# Altium PCB BMS042A_PCB.PcbDoc (part 3 of 5)
Units mil, origin at the board's own origin, x right, y up, seen from the top; angles counter-clockwise.
Board outline 4409.45 x 3307 mil, 6 copper layers (Top Layer, Layer 2 - PGND, Layer 3, Layer 4, Layer 5 - PGND, Bottom Layer), stack 60.8 mil thick; 273 components, 77 nets, 544 pads, 927 vias.
Unrouted connection lines stored in the file: 219.
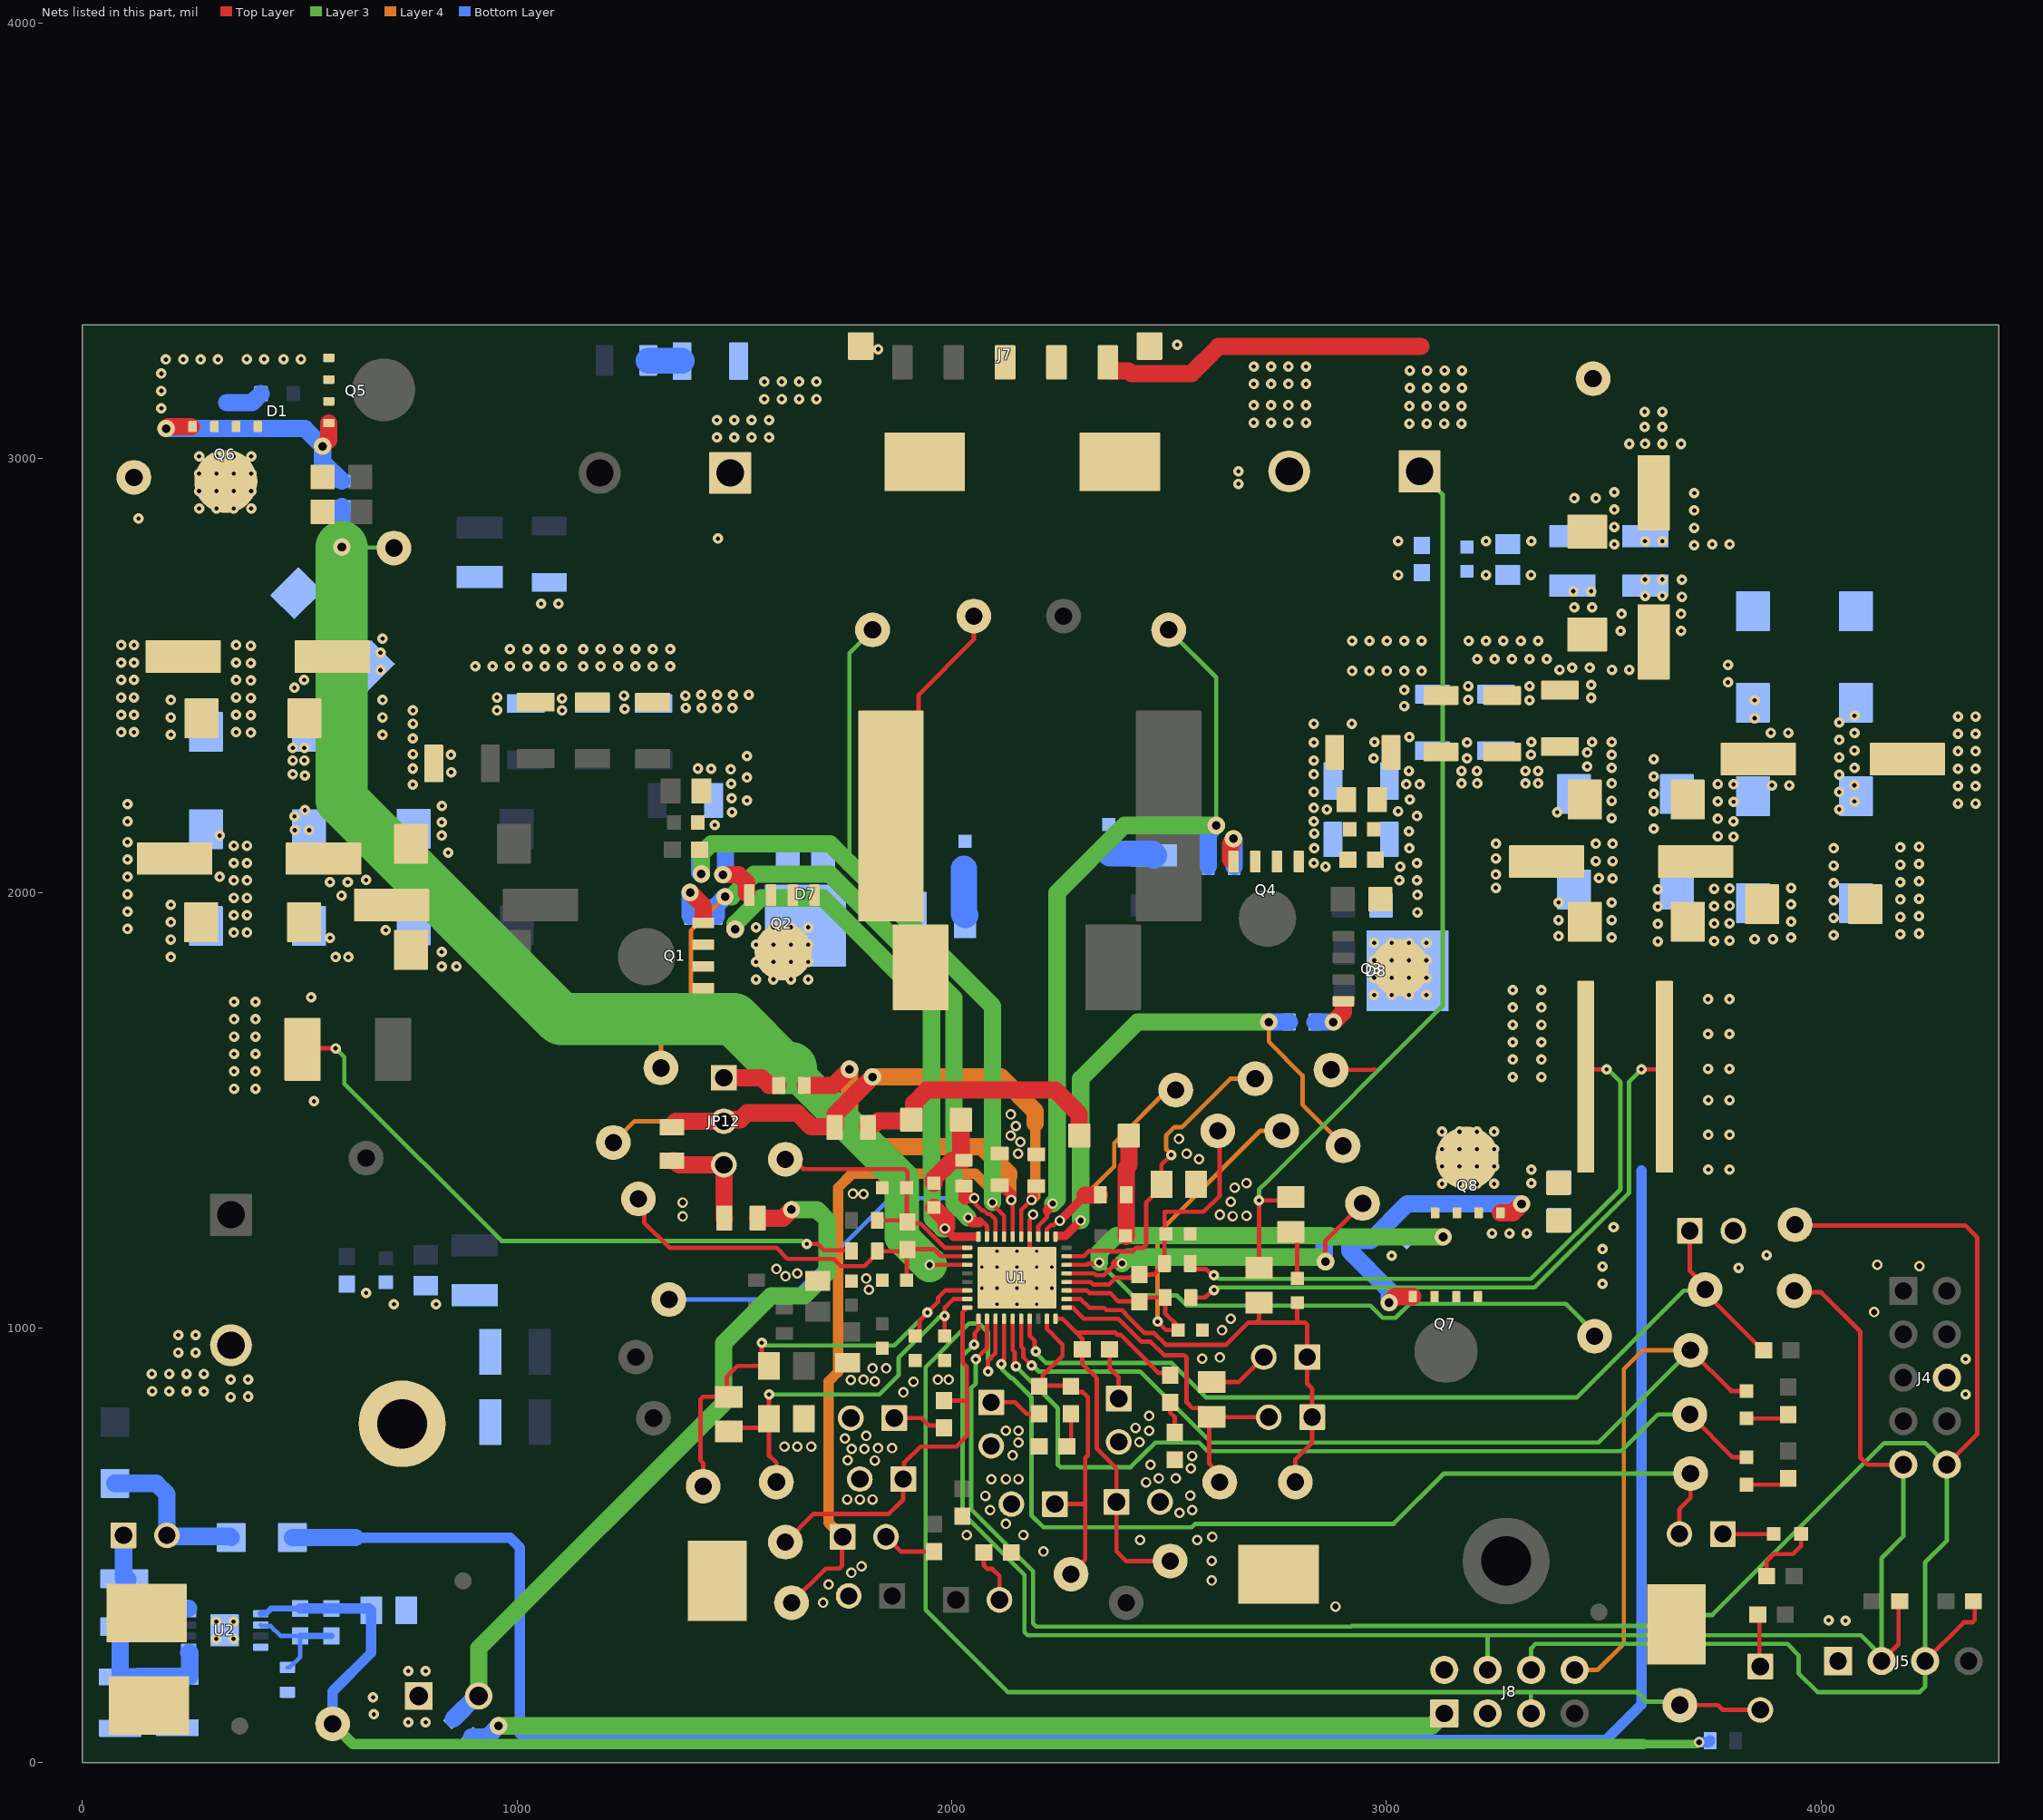
[diagram p6: the nets of this part, all layers, seen from the top]

## Part data (continued)
J7: library part CMP-0097332-1, "Conn Board to Board HDR 5 POS 3mm Solder RA SMD T/R", Current_A=5A, Digikey Part Number=478-109159005101916CT-ND, Manufacturer="KYOCERA AVX", Mouser Part Number=581-109159005101916, Operating Temperature Range="-40°C to +125°C", Voltage_V=125V, AEC Qualified=No, ComponentLink1Description=Datasheet, ComponentLink1URL=https://datasheets.kyocera-avx.com/HorizontalPlug_10-9159.pdf, Conn Gender=Male, Conn Orientation=Horizontal, ContactFinish=Gold,Nickel, datasheet=https://datasheets.kyocera-avx.com/HorizontalPlug_10-9159.pdf, Datasheet Path=datasheets/Conn-109159005101916.pdf, Digikey Description="CONN SSL PLUG", DUT-Pitch_mm=3mm, helpURL=https://upverter.com/upn/revision/17913b53be5bcd53/, Lead Free=Yes, Mouser Description="Conn Board to Board HDR 5 POS 3mm Solder RA SMD T/R", PackageReference=CONN_SSL_PLUG5, Part Number=109159005101916, PartNumber=109159005101916, PinCount=5, RoHS=TRUE, Row_Count=1, SizeZ_mm=3.1mm, Standoff Height=0.1mm, Supplier 1=Digikey, Supplier 2=Mouser, Supplier Part Number 1=478-109159005101916CT-ND, Supplier Part Number 2=581-109159005101916
J8: library part CMP-0075408-3, "Header, 100mil, 4x2, Gold, TH", Color=Black, Current_A=6.3A, Manufacturer=Samtec, Supplier Part Number 1=SAM1028-04-ND, Voltage_V=550V, Cert_CSA=Y, Cert_CULUS=N, Cert_UL=Y, Cert_VDE=N, ClassName=Header, ComponentLink1Description="Datasheet URL", ComponentLink1URL=http://samtec.com/ftppub/pdf/TSW_TH.PDF, CompType=Header, ContactFinish=Gold, Gender=Male, Green_EU RoHS=Passed, Green_EU RoHS-2=Passed, Green_Lifecycle=Active, Green_REACh=Passed, MountType=TH, Orientation=Vertical, PackageReference="4x2 Header", PartNumber=TSW-104-07-G-D, PinCount=8, Pitch_mm=2.54, RoHS=Y, Row_Count=2, RowSpacing_mm=2.54, Shrouded=N, Supplier 1=Digi-Key, Supplier 2=Mouser, Supplier 3=Newark, Supplier Part Number 2=200-TSW10407GD, Supplier Part Number 3=56AC7178
JP1 JP2 JP13 JP14 JP15: library part CMP-0002337-1, "Header, 100mil, 2x1, Tin, TH", Color=Black, Current_A=3A, Manufacturer="Sullins Connector Solutions", Supplier Part Number 1=S1012E-02-ND, Voltage_V=1.8kV, Cert_UL=Y, ClassName=Header, CNHeader=TRUE, ComponentLink1Description="Datasheet URL", ComponentLink1URL=http://www.sullinscorp.com/catalogs/77_PAGE108-109_.100_MALE_HDR.pdf, CompType=Header, ContactFinish=Tin, CT=FALSE, Gender=Male, Green_EU RoHS=Incomplete, Green_EU RoHS-2=Incomplete, Green_Lifecycle="Not Set", Green_REACh=Incomplete, LatestRevisionDate=26/05/2017, MountType=TH, Orientation=Vertical, PackageReference="Header, 2 PIN, 100mil, Tin", PartNumber=PEC02SAAN, PinCount=2, Pitch_mm=2.54, Publisher="Texas Instruments", RoHS=Y, Row_Count=1, Shrouded=N, Supplier 1=Digi-Key
JP3 JP4 JP5 JP6 JP7 JP8 JP9 JP10 JP11 JP16: library part CMP-0002337-1, "Header, 100mil, 2x1, Tin, TH", Color=Black, Current_A=3A, Manufacturer="Sullins Connector Solutions", PartNumber=PEC02SAAN, Supplier Part Number 1=S1012E-02-ND, Voltage_V=1.8kV, Cert_UL=Y, ClassName=Header, CNHeader=TRUE, ComponentLink1Description="Datasheet URL", ComponentLink1URL=http://www.sullinscorp.com/catalogs/77_PAGE108-109_.100_MALE_HDR.pdf, CompType=Header, ContactFinish=Tin, CT=FALSE, Gender=Male, Green_EU RoHS=Incomplete, Green_EU RoHS-2=Incomplete, Green_Lifecycle="Not Set", Green_REACh=Incomplete, LatestRevisionDate=26/05/2017, MountType=TH, Orientation=Vertical, PackageReference="Header, 2 PIN, 100mil, Tin", PinCount=2, Pitch_mm=2.54, Publisher="Texas Instruments", RoHS=Y, Row_Count=1, Shrouded=N, Supplier 1=Digi-Key
JP12: library part CMP-0002338-1, "Header, 100mil, 3x1, Tin, TH", Color=Black, Current_A=3A, Manufacturer="Sullins Connector Solutions", Supplier Part Number 1=S1012E-03-ND, Voltage_V=1.8kV, Cert_UL=Y, ClassName=Header, CNHeader=TRUE, ComponentLink1Description="Datasheet URL", ComponentLink1URL=http://www.sullinscorp.com/catalogs/77_PAGE108-109_.100_MALE_HDR.pdf, CompType=Header, ContactFinish=Tin, CT=FALSE, Gender=Male, Green_EU RoHS=Incomplete, Green_EU RoHS-2=Incomplete, Green_Lifecycle="Not Set", Green_REACh=Incomplete, LatestRevisionDate=26/05/2017, MountType=TH, Orientation=Vertical, PackageReference="Header, 3 PIN, 100mil, Tin", PartNumber=PEC03SAAN, PinCount=3, Pitch_mm=2.54, Publisher="Texas Instruments", RoHS=Y, Row_Count=1, Shrouded=N, Supplier 1=Digi-Key
L1: library part CMP-0093259-1, "Commercial Inductors, High Saturation Series 10uH 16.5A 12mΩ 20%", Manufacturer=Vishay, Operating Temperature Range="-55°C to +125°C", Test Frequency=100kHz, Tolerance_%=20%, AEC Qualified=No, ComponentLink1Description=Datasheet, ComponentLink1URL=http://www.vishay.com/doc?34000, datasheet=http://www.vishay.com/doc?34000, Datasheet Path=datasheets/Ind-IHLP6767GZER100M01.pdf, DCR_ohm=12m, helpURL=https://upverter.com/upn/revision/3696de4ae63643cd/, Ind_H=10µH, Irms=16.5A, Isat=25A, Lead Free=Yes, Material=SMC, PackageReference=SMT_INDUCTOR_17MM15_17MM15, Part Number=IHLP6767GZER100M01, PartNumber=IHLP6767GZER100M01, RoHS=TRUE, Shrouded=true, SizeZ_mm=7mm, Technology=Wirewound
L2: library part CMP-0096007-1, "Power Choke Coil 10uH 20% 9A 22mOhm", Manufacturer=Cyntec, Operating Temperature Range="-55°C to +125°C", Test Frequency=100kHz, Tolerance_%=20%, AEC Qualified=No, ComponentLink1Description=Datasheet, ComponentLink1URL=https://www.cyntec.com/upfile/products/download/CMLB135T-000%20(A6).pdf, datasheet=https://www.cyntec.com/upfile/products/download/CMLB135T-000%20(A6).pdf, Datasheet Path=datasheets/Ind-CMLB135T-100MS.pdf, DCR_ohm=22m, helpURL=https://upverter.com/upn/revision/6710307a1186a91b/, Ind_H=10µH, Irms=9A, Isat=10.5A, Lead Free=Yes, Material="Metal Dust", PackageReference=SMT2_13MM45_12Mm6, Part Number=CMLB135T-100MS, PartNumber=CMLB135T-100MS, RoHS=TRUE, SizeZ_mm=5mm, Standoff Height=0mm
LBL1: library part CMP-0003625-1, "Thermal Transfer Printable Labels, 0.650\" W x 0.200\" H - 10,000 per roll", Manufacturer=Brady, Supplier Part Number 1=97C5133, ClassName=Label, ComponentLink1Description="Web Page", ComponentLink1URL=http://www.bradyid.com/bradyid/pdpv/THT-14-423-10.html, CompType=Label, Key=THT-14-423-10, LatestRevisionDate=2017-03-09, MountType=N/A, Note="Size: 0.65\" x 0.20 \"", PackageReference="PCB Label 0.650 x 0.200 inch", PartNumber=THT-14-423-10, Publisher="Texas Instruments", RoHS=Y, Supplier 1=Newark, Supplier 2=Farnell, Supplier Part Number 2=2065596
LOGO1: library part CMP-0074835-1, "IEC 61010-1 High Voltage Warning", LatestRevisionDate=2017-07-06, Lib Reference=IEC_HighVoltage, PartNumber="DANGER HIGH VOLTAGE", Published=2009-03-03, Publisher="Texas Instruments", SymbolCreator=a0412235, SymbolVersion=2011-08-22
LOGO2: library part CMP-0074837-2, "IEC 61010-1 Hot Surface Warning", Manufacturer="Texas Instruments", AEC Category=Q200, ComponentLink1Description="Datasheet Link", ComponentLink1URL=http://www.ti.com/lit/ds/symlink/GPN.pdf, ComponentLink2Description="Product Folder", ComponentLink2URL=http://www.ti.com/product/GPN, ComponentLink3Description="Online Datasheet", ComponentLink3URL=http://www.ti.com/product/GPN/datasheet, CompType=IC, LatestRevisionDate=2017-07-06, Lib Reference=IEC_HotSurface, PartNumber="CAUTION HOT SURFACE", Published=2009-03-03, Publisher="Texas Instruments", SymbolCreator=a0412235, SymbolVersion=2011-08-22
LOGO3: library part CMP-0074836-1, "IEC 61010-1 Caution Warning", LatestRevisionDate=2017-07-06, Lib Reference=IEC_Caution, PartNumber="CAUTION.  READ USER GUIDE BEFORE USE", Published=2009-03-03, Publisher="Texas Instruments", SymbolCreator=a0412235, SymbolVersion=2011-08-22
LOGO5: library part CMP-0074844-1, LatestRevisionDate=2017-07-06, Lib Reference="CE Mark", PartNumber="CE Mark", Published=2009-03-03, Publisher="Texas Instruments", SymbolCreator=a0412235
LOGO6: library part CMP-0074847-1, "FCC_disclaimer", LatestRevisionDate=2017-07-06, Lib Reference=FCC_disclaimer, PartNumber="FCC disclaimer", Published=2009-03-03, Publisher="Texas Instruments"
LOGO7: library part CMP-0074769-1, Lib Reference="WEEE logo", PartNumber="WEEE logo"
Q1 Q2 Q3 Q4: library part CMP-0096839-1, "N-Channel 80 V 18.6A (Ta), 70.6A (Tc) 5W (Ta), 71.4W (Tc) Surface Mount PowerPAK® SO-8", Digikey Part Number=742-SIR880BDP-T1-RE3CT-ND, Drain To Source Breakdown Voltage=80V, Input Capacitace At Vds="2930pF @ 40V", Manufacturer=Vishay, Mouser Part Number=78-SIR880BDP-T1-RE3, Operating Temperature Range="-55°C to +150°C", Power_W=5W, Pulse Drain Current=200A, Typ Forward Diode Voltage=0.74V, AEC Qualified=No, ChMode=False, ComponentLink1Description=Datasheet, ComponentLink1URL=https://www.vishay.com/docs/63031/sir880bdp.pdf, datasheet=https://www.vishay.com/docs/63031/sir880bdp.pdf, Datasheet Path=datasheets/Trans-SIR880BDP-T1-RE3.pdf, Digikey Description="N-CHANNEL 80-V (D-S) MOSFET POWE", helpURL=https://upverter.com/upn/revision/df129d86407baf6e/, IdsMax_A=18.6A, Lead Free=Yes, Number of Channels=1, Number Of N Channels=1, PackageReference=SO-8, Part Number=SIR880BDP-T1-RE3, PartNumber=SIR880BDP-T1-RE3, QgTyp_nC="43.5nC @ 10V", Rdson45_ohm=5.3m, Reverse Recovery Charge=52nC, Reverse Recovery Time=38ns, RoHS=TRUE, Rthja Max=20°C/W, SizeZ_mm=1.12mm, Threshold Vgs Max=2.4V, Threshold Vgs Min=1V, Tjmax_C=+150°C, Transconductance=49S, Turn Off Delay Time=40ns, Turn On Delay Time=12ns, VdsMax_V=1.1V, Vgs_V=20V
Q5 Q6 Q7 Q8: library part CMP-0093242-3, "100V N-Channel MOSFET, DFN5x6-8L, RoHS", Drain To Source Breakdown Voltage=100V, Input Capacitace At Vds="5940pF @ 50V", Manufacturer="Alpha & Omega Semiconductor", Operating Temperature Range="-55°C to +150°C", Power_W=6.2W, Pulse Drain Current=320A, Typ Forward Diode Voltage=0.68V, AEC Qualified=No, ChMode=False, ComponentLink1Description=Datasheet, ComponentLink1URL=http://www.aosmd.com/res/data_sheets/AONS66917.pdf, datasheet=http://www.aosmd.com/res/data_sheets/AONS66917.pdf, Datasheet Path=datasheets/Trans-AONS66917.pdf, helpURL=https://upverter.com/upn/revision/7df9f1155c57d30a/, IdsMax_A=100A, Lead Free=Yes, Number of Channels=1, Number Of N Channels=1, PackageReference=DFN8, Part Number=AONS66917, PartNumber=AONS66917, QgTyp_nC="80nC @ 10V", Rdson45_ohm=2.9m, Reverse Recovery Charge=208nC, Reverse Recovery Time=43ns, RoHS=TRUE, Rthja Max=40°C/W, SizeZ_mm=1.05mm, Standoff Height=0mm, Threshold Vgs Max=2.8V, Threshold Vgs Min=1.7V, Tjmax_C=+150°C, Transconductance=100S, Turn Off Delay Time=46ns, Turn On Delay Time=16.5ns, VdsMax_V=1V, Vgs_V=20V
R2: library part CMP-0096841-1, "Res Metal Strip 2512 0.005 Ohm 1% 1W 110ppm/C Molded SMD SMD Embossed Plastic T/R", Digikey Part Number=WSLG-.005CT-ND, Manufacturer=Vishay, Mouser Part Number=71-WSL25125L000FEA, Octopart Part Number=dd8716d1bbbb0240, Operating Temperature Range="-65°C to +170°C", Power_W=1W, TempCo=110ppm/°C, Tolerance_%=1%, AEC Grade="Grade 0", AEC Qualified=Yes, Category 5A00970A6D5C81C7=Uncategorized, Category 5C6A91606D4187Ad=Resistors, Category 7542B8484461Ae85="Passive Components", Category Cd01000Bfc2916C6="Single Components", ComponentLink1Description=Datasheet, ComponentLink1URL=https://www.vishay.com/docs/30100/wsl.pdf, datasheet=https://www.vishay.com/docs/30100/wsl.pdf, Datasheet Path=datasheets/Res-WSL25125L000FEA.pdf, Digikey Description="RES 0.005 OHM 1% 1W 2512", helpURL=https://upverter.com/upn/revision/4a960a7eb29c827a/, Lead Free=Yes, Mouser Description="Current Sense Resistors - SMD 1watt .005ohms 1%", PackageReference=2512, Part Number=WSL25125L000FEA, PartNumber=WSL25125L000FEA, Res_ohm=5m, RoHS=TRUE, Series=WSL, SizeZ_mm=0.889mm, Supplier 1=Digikey, Supplier 2=Mouser, Supplier Part Number 1=WSLG-.005CT-ND, Supplier Part Number 2=71-WSL25125L000FEA, Technology="Metal Element"
R3 R8 R9 R12 R13 R17 R20 R23 R68 R69 R100 R101 R160: library part CMP-0093629-1, "Thick Film Resistors - SMD 1/10watt ZEROohm Jumper", Manufacturer=Vishay, Operating Temperature Range="-55°C to +155°C", Power=250mW, Power_W=330mW, TempCo=100ppm/°C, Tolerance_%=1%, AEC Grade="Grade 0", AEC Qualified=Yes, ComponentLink1Description=Datasheet, ComponentLink1URL=http://www.vishay.com/docs/20043/crcwhpe3.pdf, datasheet=http://www.vishay.com/docs/20043/crcwhpe3.pdf, Datasheet Path=datasheets/Res-CRCW06031R50FKEAHP.pdf, helpURL=https://upverter.com/upn/revision/04facc8566ca24c1/, Lead Free=Yes, PackageReference=0603, Part Number=CRCW06030000Z0EA, PartNumber=CRCW06030000Z0EA, Res_ohm=1.5, RoHS=TRUE, Series="CRCW-HP e3", SizeZ_mm=0.55mm, Technology="Thick Film", VDC_V=75V
R5 R6 R22 R25: library part CMP-0093685-1, "RES Thick Film, 10Ω, 1%, 0.1W, 100ppm/°C, 0603", Approved Alternate Part Number=541-1.00HHCT-ND, Manufacturer=Vishay, Operating Temperature Range="-55°C to +155°C", Power=100mW, TempCo=100ppm/°C, Tolerance_%=1%, Voltage=75V, AEC Grade="Grade 0", AEC Qualified=Yes, ComponentLink1Description=Datasheet, ComponentLink1URL=http://www.vishay.com/docs/20035/dcrcwe3.pdf, datasheet=http://www.vishay.com/docs/20035/dcrcwe3.pdf, Datasheet Path=datasheets/Res-CRCW060310R0FKEB.pdf, helpURL=https://upverter.com/upn/revision/3a87135a4406d73b/, Lead Free=Yes, PackageReference=0603, Part Number=CRCW060310R0FKEB, PartNumber=CRCW060310R0FKEB, Power_W=100mW, Res_ohm=10, RoHS=TRUE, Series="D/CRCW e3", SizeZ_mm=0.5mm, Technology="Thick Film", VDC_V=75V
R10: library part CMP-0093410-1, "RES Thick Film, 10Ω, 1%, 0.75W, 100ppm/°C, 1206", Manufacturer="Vishay Dale", Operating Temperature Range="-55°C to +155°C", Power_W=750mW, TempCo=100ppm/°C, Tolerance_%=1%, AEC Grade="Grade 0", AEC Qualified=Yes, ComponentLink1Description=Datasheet, ComponentLink1URL=https://www.vishay.com/docs/20043/crcwhpe3.pdf, datasheet=https://www.vishay.com/docs/20043/crcwhpe3.pdf, Datasheet Path=datasheets/Res-CRCW120610R0FKEAHP.pdf, helpURL=https://upverter.com/upn/revision/2e156fd88116072b/, Lead Free=Yes, PackageReference=1206, Part Number=CRCW120610R0FKEAHP, PartNumber=CRCW120610R0FKEAHP, Res_ohm=10, RoHS=TRUE, Series=CRCW-HP, SizeZ_mm=0.65mm, Technology="Thick Film", VDC_V=200V
R14 R15: library part CMP-0015022-3, "RES, 3.30, 1%, 0.75 W, AEC-Q200 Grade 0, 1210", Manufacturer=Vishay-Dale, Power_W=750mW, Supplier Part Number 1=541-3.30DCT-ND, TempCo="100 ppm/C", Tolerance_%=1%, Value2=0.75W, Value_Code=3R30, ValueDisplayed=3.30, AEC Category=Q200, AEC Grade=0, AEC Qualified=Y, ComponentLink1Description="Datasheet link", ComponentLink1URL=http://www.vishay.com/docs/20043/crcwhpe3.pdf, CompType=Resistor, MountType=SMT, PackageReference=1210, PartNumber=CRCW12103R30FKEAHP, Res_ohm=3.3, RoHS=E, SizeArea_mm2=8, SizeAreaWB_mm2=14.7, SizeX_mm=3.2, SizeY_mm=2.5, SizeZ_mm=1.35, Supplier 1=Digi-Key, Supplier 2=Mouser, Supplier Part Number 2=71-CRCW12103R30FKEAH, Technology="Thick Film", Value1=1%
R21: library part CMP-0021522-3, "Thick Film Resistors - SMD 1/8Watt 1Mohms 1% Commercial Use", Manufacturer="Vishay / Dale", Power_W=125mW, Supplier Part Number 1=P1.00MCCT-ND, TempCo="100 ppm/C", Tolerance_%=1%, Value2=0.125W, Value_Code=1M00, ValueDisplayed=1.00M, AEC Category=Q200, AEC Grade=0, AEC Qualified=Y, ComponentLink1Description="Datasheet link", ComponentLink1URL=https://industrial.panasonic.com/cdbs/www-data/pdf/RDA0000/AOA0000C304.pdf, CompType=Resistor, EIA_Code=E96, MountType=SMT, PackageReference=0805, PartNumber=CRCW08051M00FKEAC, Res_ohm=1M, RoHS=Y, SizeArea_mm2=2.5, SizeAreaWB_mm2=6.75, SizeX_mm=2, SizeY_mm=1.25, SizeZ_mm=1.45, Supplier 1=Digi-Key, Supplier 2=Mouser, Supplier 3=Farnell, Supplier Part Number 2=667-ERJ-6ENF1004V, Supplier Part Number 3=1748405, Technology="Thick Film", Value1=1%
R24: library part CMP-0093177-1, "5 mOhms ±1% 5W Chip Resistor Wide 4320 (11050 Metric), 2043 Current Sense, Moisture Resistant Metal Foil", Digikey Part Number=FCSL110R005FERCT-ND, Manufacturer=Ohmite, Mouser Part Number=588-FCSL110R005FER, Operating Temperature Range="-55°C to +155°C", Power_W=5W, TempCo=50ppm/°C, Tolerance_%=1%, AEC Qualified=No, ComponentLink1Description=Datasheet, ComponentLink1URL=https://www.ohmite.com/assets/docs/res_fcsl.pdf?r=false, datasheet=https://www.ohmite.com/assets/docs/res_fcsl.pdf?r=false, Datasheet Path=datasheets/Res-FCSL110R005FER.pdf, Digikey Description="RES 0.005 OHM 5W 4320 WIDE", helpURL=https://upverter.com/upn/revision/5f4444effce72528/, Lead Free=Yes, Mouser Description="Res Metal Foil 2043 0.005 Ohm 1% 5W ±50ppm/°C Epoxy Resin Wide Terminal SMD T/R", PackageReference=WIDE_4320, Part Number=FCSL110R005FER, PartNumber=FCSL110R005FER, Res_ohm=5m, RoHS=TRUE, Series=FCSL, SizeZ_mm=0.7mm, Supplier 1=Digikey, Supplier 2=Mouser, Supplier Part Number 1=FCSL110R005FERCT-ND, Supplier Part Number 2=588-FCSL110R005FER, Technology="Metal Foil"
R27: library part CMP-0021561-3, "RES, 133 k, 1%, 0.125 W, AEC-Q200 Grade 0, 0805", Manufacturer=Panasonic, Power_W=125mW, Supplier Part Number 1=P133KCCT-ND, TempCo="100 ppm/C", Tolerance_%=1%, Value2=0.125W, Value_Code=133k, AEC Category=Q200, AEC Grade=0, AEC Qualified=Y, ComponentLink1Description="Datasheet link", ComponentLink1URL=https://industrial.panasonic.com/cdbs/www-data/pdf/RDA0000/AOA0000C304.pdf, CompType=Resistor, EIA_Code=E96, MountType=SMT, PackageReference=0805, PartNumber=ERJ-6ENF1333V, Res_ohm=133k, RoHS=Y, SizeArea_mm2=2.5, SizeAreaWB_mm2=6.75, SizeX_mm=2, SizeY_mm=1.25, SizeZ_mm=1.45, Supplier 1=Digi-Key, Supplier 2=Mouser, Supplier Part Number 2=667-ERJ-6ENF1333V, Technology="Thick Film", Value1=1%, ValueDisplayed=133k
R28: library part CMP-0018933-2, "Thick Film Resistors - SMD 0805 Anti-Surge Res. 0.1%, 249Kohm", Manufacturer=Panasonic, Power_W=125mW, Supplier Part Number 1=RG20P249KBCT-ND, TempCo="25 ppm/C", Tolerance_%=0.1%, Value2=0.125W, Value_Code=249k, AEC Category=Q200, AEC Qualified=?, ComponentLink1Description="Datasheet link", ComponentLink1URL=http://www.susumu.co.jp/english/pdf/products-j01-01.pdf, CompType=Resistor, EIA_Code=E192, LatestRevisionDate=2017-03-09, MountType=SMT, PackageReference=0805, PartNumber=ERJ-PB6B2493V, Published=2008-06-26, Publisher="Texas Instruments", Res_ohm=249k, RoHS=Y, SizeArea_mm2=2.5, SizeX_mm=2, SizeY_mm=1.25, SizeZ_mm=1.45, Supplier 1=Digi-Key, Supplier 2=Mouser, Supplier Part Number 2=754-RG2012P-2493-BT5, Technology="Thin Film", U/M=EA, Value1=0.1%, ValueDisplayed=249k, VDC_V=100V
R30: library part CMP-0021646-3, "RES, 25.5 k, 1%, 0.125 W, AEC-Q200 Grade 0, 0805", Manufacturer=Panasonic, Power_W=125mW, Supplier Part Number 1=P25.5KCCT-ND, TempCo="100 ppm/C", Tolerance_%=1%, Value2=0.125W, Value_Code=25k5, ValueDisplayed=25.5k, AEC Category=Q200, AEC Grade=0, AEC Qualified=Y, ComponentLink1Description="Datasheet link", ComponentLink1URL=https://industrial.panasonic.com/cdbs/www-data/pdf/RDA0000/AOA0000C304.pdf, CompType=Resistor, EIA_Code=E96, MountType=SMT, PackageReference=0805, PartNumber=ERJ-6ENF2552V, Res_ohm=25.5k, RoHS=Y, SizeArea_mm2=2.5, SizeAreaWB_mm2=6.75, SizeX_mm=2, SizeY_mm=1.25, SizeZ_mm=1.45, Supplier 1=Digi-Key, Supplier 2=Mouser, Supplier Part Number 2=667-ERJ-6ENF2552V, Technology="Thick Film", Value1=1%
R32: library part CMP-0021666-2, "RES, 3.00 k, 1%, 0.125 W, AEC-Q200 Grade 0, 0805", Manufacturer=Panasonic, Power_W=125mW, Supplier Part Number 1=P3.0KCCT-ND, TempCo="100 ppm/C", Tolerance_%=1%, Value2=0.125W, Value_Code=3k00, ValueDisplayed=3.00k, AEC Category=Q200, AEC Grade=0, AEC Qualified=Y, ComponentLink1Description="Datasheet link", ComponentLink1URL=http://industrial.panasonic.com/lecs/www-data/pdf/AOA0000/AOA0000CE2.pdf, CompType=Resistor, LatestRevisionDate=2017-03-09, MountType=SMT, PackageReference=0805, PartNumber=ERJ-6ENF3001V, Published=2008-06-26, Publisher="Texas Instruments", Res_ohm=3k, RoHS=Y, SizeArea_mm2=2.5, SizeX_mm=2, SizeY_mm=1.25, SizeZ_mm=1.45, Supplier 1=Digi-Key, Supplier 2=Newark, Supplier 3=Mouser, Supplier Part Number 2=65T8733, Supplier Part Number 3=667-ERJ-6ENF3001V, Technology="Thick Film", U/M=EA, Value1=1%, VDC_V=150V
R34: library part CMP-0023199-5, "RES, 5.23 k, 1%, 0.1 W, 0603", Manufacturer=Yageo, Power_W=100mW, Supplier Part Number 1=311-5.23KHRCT-ND, TempCo="100 ppm/C", Tolerance_%=1%, Value2=0.1W, Value_Code=5k23, ValueDisplayed=5.23k, AEC Category=Q200, AEC Grade=N/A, AEC Qualified=N, ComponentLink1Description="Datasheet link", ComponentLink1URL=http://www.yageo.com/pdf/Pu-RC0603_51_PbFree_L_2.pdf, CompType=Resistor, EIA_Code=E96, MountType=SMT, PackageReference=0603, PartNumber=RC0603FR-075K23L, Res_ohm=5.23k, RoHS=Y, SizeArea_mm2=1.28, SizeAreaWB_mm2=4.68, SizeX_mm=1.6, SizeY_mm=0.8, SizeZ_mm=1, Supplier 1=Digi-Key, Supplier 2=Mouser, Supplier 3=Farnell, Supplier Part Number 2=603-RC0603FR-075K23L, Supplier Part Number 3=9238573, Technology="Thick Film", Value1=1%, VDC_V=75V
R36: library part CMP-0022038-4, "RES, 133 k, 1%, 0.1 W, AEC-Q200 Grade 0, 0603", Manufacturer=Vishay-Dale, Power_W=100mW, Supplier Part Number 1=541-133KHCT-ND, TempCo="100 ppm/C", Tolerance_%=1%, Value2=0.1W, Value_Code=133k, AEC Category=Q200, AEC Grade=0, AEC Qualified=Y, ComponentLink1Description="Datasheet link", ComponentLink1URL=http://www.vishay.com/docs/20035/dcrcwe3.pdf, CompType=Resistor, EIA_Code=E96, MountType=SMT, PackageReference=0603, PartNumber=CRCW0603133KFKEA, Res_ohm=133k, RoHS=E, SizeArea_mm2=1.28, SizeX_mm=1.6, SizeY_mm=0.8, SizeZ_mm=1, Supplier 1=Digi-Key, Supplier 2=Newark, Supplier 3=Mouser, Supplier Part Number 2=52K8129, Supplier Part Number 3=71-CRCW0603-133K-E3, Technology="Thick Film", Value1=1%, ValueDisplayed=133k, VDC_V=75V
R41 R53 R54 R55 R56: library part CMP-0022746-5, "RES, 10.0 k, 1%, 0.1 W, 0603", Manufacturer=Yageo, Power_W=100mW, Supplier Part Number 1=311-10.0KHRCT-ND, TempCo="100 ppm/C", Tolerance_%=1%, Value2=0.1W, Value_Code=10k0, ValueDisplayed=10.0k, AEC Category=Q200, AEC Grade=N/A, AEC Qualified=N, ComponentLink1Description="Datasheet link", ComponentLink1URL=http://www.yageo.com/pdf/Pu-RC0603_51_PbFree_L_2.pdf, CompType=Resistor, EIA_Code=E96, MountType=SMT, PackageReference=0603, PartNumber=RC0603FR-0710KL, Res_ohm=10k, RoHS=Y, SizeArea_mm2=1.28, SizeAreaWB_mm2=4.68, SizeX_mm=1.6, SizeY_mm=0.8, SizeZ_mm=1, Supplier 1=Digi-Key, Supplier 2=Mouser, Supplier 3=Farnell, Supplier Part Number 2=603-RC0603FR-0710KL, Supplier Part Number 3=9238603, Technology="Thick Film", Value1=1%, VDC_V=75V
R45 R120: library part CMP-0092857-1, "Thick Film Resistors - SMD 1/8watt ZEROohm Jumper", Manufacturer=Vishay, Operating Temperature Range="-55°C to +155°C", Power_W=500mW, TempCo=200ppm/°C, Tolerance_%=5%, AEC Grade="Grade 0", AEC Qualified=Yes, ComponentLink1Description=Datasheet, ComponentLink1URL=https://www.vishay.com/docs/20043/crcwhpe3.pdf, datasheet=https://www.vishay.com/docs/20043/crcwhpe3.pdf, Datasheet Path=datasheets/Res-CRCW080510R0JNEAHP.pdf, helpURL=https://upverter.com/upn/revision/5f84fa7f25e15205/, Lead Free=Yes, PackageReference=0805, Part Number=CRCW08050000Z0EA, PartNumber=CRCW08050000Z0EA, Res_ohm=0, RoHS=TRUE, Series="CRCW-HP e3", SizeZ_mm=0.6mm, Technology="Thick Film", VDC_V=150V
R46: library part CMP-0092853-1, "Thick Film Resistors - SMD 3/4watt 20ohms 1% High Power AEC-Q200", Manufacturer="Vishay Dale", Operating Temperature Range="-55°C to +155°C", Part Number=CRCW12104R30FKEAHP, Power_W=750mW, TempCo=100ppm/°C, Tolerance_%=1%, AEC Grade="Grade 0", AEC Qualified=Yes, ComponentLink1Description=Datasheet, ComponentLink1URL=https://www.vishay.com/docs/20043/crcwhpe3.pdf, datasheet=https://www.vishay.com/docs/20043/crcwhpe3.pdf, Datasheet Path=datasheets/Res-CRCW12104R30FKEAHP.pdf, helpURL=https://upverter.com/upn/revision/eccf930902a4b7c5/, Lead Free=Yes, PackageReference=1210, PartNumber=CRCW121020R0FKEAHP, Res_ohm=4.3, RoHS=TRUE, Series="CRCW-HP e3", SizeZ_mm=0.7mm, Technology="Thick Film", VDC_V=200V
R48: library part CMP-0023140-4, "RES, 499 k, 1%, 0.1 W, 0603", Manufacturer=Yageo, Power_W=100mW, Supplier Part Number 1=311-499KHRCT-ND, TempCo="100 ppm/C", Tolerance_%=1%, Value2=0.1W, Value_Code=499k, AEC Category=Q200, AEC Grade=N/A, AEC Qualified=N, ComponentLink1Description="Datasheet link", ComponentLink1URL=http://www.yageo.com/pdf/Pu-RC0603_51_PbFree_L_2.pdf, CompType=Resistor, EIA_Code=E96, MountType=SMT, PackageReference=0603, PartNumber=RC0603FR-07499KL, Res_ohm=499k, RoHS=Y, SizeArea_mm2=1.28, SizeAreaWB_mm2=4.68, SizeX_mm=1.6, SizeY_mm=0.8, SizeZ_mm=1, Supplier 1=Digi-Key, Supplier 2=Mouser, Supplier 3=Farnell, Supplier Part Number 2=603-RC0603FR-07499KL, Supplier Part Number 3=1799347, Technology="Thick Film", Value1=1%, ValueDisplayed=499k, VDC_V=75V
R49: library part CMP-0093627-1, "Thick Film Chip Resistors 0603 316kΩ 0.1W 1% 100ppm/°C", Manufacturer=Bourns, Operating Temperature Range="-55°C to +155°C", Power_W=100mW, TempCo=100ppm/°C, Tolerance_%=1%, AEC Qualified=No, ComponentLink1Description=Datasheet, ComponentLink1URL=https://www.bourns.com/docs/product-datasheets/crxxxxx.pdf, datasheet=https://www.bourns.com/docs/product-datasheets/crxxxxx.pdf, Datasheet Path=datasheets/Res-CR0603-FX-3163ELF.pdf, helpURL=https://upverter.com/upn/revision/c2f1e259ecd4a9fd/, Lead Free=Yes, PackageReference=0603, Part Number=CR0603-FX-3163ELF, PartNumber=CR0603-FX-3163ELF, Res_ohm=316k, RoHS=TRUE, Series=CR0603, SizeZ_mm=0.55mm, Technology="Thick Film", VDC_V=75V
R50 R51 R52: library part CMP-0022984-5, "RES, 2.21 k, 1%, 0.1 W, 0603", Manufacturer=Yageo, Power_W=100mW, Supplier Part Number 1=311-2.21KHRCT-ND, TempCo="100 ppm/C", Tolerance_%=1%, Value2=0.1W, Value_Code=2k21, ValueDisplayed=2.21k, AEC Category=Q200, AEC Grade=N/A, AEC Qualified=N, ComponentLink1Description="Datasheet link", ComponentLink1URL=http://www.yageo.com/pdf/Pu-RC0603_51_PbFree_L_2.pdf, CompType=Resistor, EIA_Code=E96, MountType=SMT, PackageReference=0603, PartNumber=RC0603FR-072K21L, Res_ohm=2.21k, RoHS=Y, SizeArea_mm2=1.28, SizeAreaWB_mm2=4.68, SizeX_mm=1.6, SizeY_mm=0.8, SizeZ_mm=1, Supplier 1=Digi-Key, Supplier 2=Mouser, Supplier 3=Farnell, Supplier Part Number 2=603-RC0603FR-072K21L, Supplier Part Number 3=1117250, Technology="Thick Film", Value1=1%, VDC_V=75V
R59: library part CMP-0020803-2, "RES, 0, 5%, 0.125 W, 0805", Manufacturer="Yageo America", Power_W=125mW, Supplier Part Number 1=311-0.0ARCT-ND, TempCo="200 ppm/C", Tolerance_%=5%, Value2=0.125W, Value_Code=0000, ValueDisplayed=0, AEC Category=Q200, AEC Qualified=?, ComponentLink1Description="Datasheet link", ComponentLink1URL=http://www.yageo.com/pdf/Pu-RC0805_51_PbFree_L_2.pdf, CompType=Resistor, EIA_Code=E24, LatestRevisionDate=2017-03-09, MountType=SMT, PackageReference=0805, PartNumber=RC0805JR-070RL, Published=2008-06-26, Publisher="Texas Instruments", Res_ohm=0, RoHS=Y, SizeArea_mm2=2.5, SizeX_mm=2, SizeY_mm=1.25, SizeZ_mm=1.45, Supplier 1=Digi-Key, Supplier 2=Mouser, Supplier 3=Farnell, Supplier Part Number 2=603-RC0805JR-070RL, Supplier Part Number 3=9233750, Technology="Thick Film", U/M=EA, Value1=5%, VDC_V=150V
R64: library part CMP-0018881-2, "RES, 13.7 k, 0.1%, 0.125 W, 0805", Manufacturer="Susumu Co Ltd", Power_W=125mW, Supplier Part Number 1=RG20P13.7KBCT-ND, TempCo="25 ppm/C", Tolerance_%=0.1%, Value2=0.125W, Value_Code=13k7, ValueDisplayed=13.7k, AEC Category=Q200, AEC Qualified=?, ComponentLink1Description="Datasheet link", ComponentLink1URL=http://www.susumu.co.jp/english/pdf/products-j01-01.pdf, CompType=Resistor, EIA_Code=E192, LatestRevisionDate=2017-03-09, MountType=SMT, PackageReference=0805, PartNumber=RG2012P-1372-B-T5, Published=2008-06-26, Publisher="Texas Instruments", Res_ohm=13.7k, RoHS=Y, SizeArea_mm2=2.5, SizeX_mm=2, SizeY_mm=1.25, SizeZ_mm=1.45, Supplier 1=Digi-Key, Supplier 2=Mouser, Supplier Part Number 2=754-RG2012P-1372-BT5, Technology="Thin Film", U/M=EA, Value1=0.1%, VDC_V=100V
R65: library part CMP-0023018-5, "RES, 30.1 k, 1%, 0.1 W, 0603", Manufacturer=Yageo, Power_W=100mW, Supplier Part Number 1=311-30.1KHRCT-ND, TempCo="100 ppm/C", Tolerance_%=1%, Value2=0.1W, Value_Code=30k1, ValueDisplayed=30.1k, AEC Category=Q200, AEC Grade=N/A, AEC Qualified=N, ComponentLink1Description="Datasheet link", ComponentLink1URL=http://www.yageo.com/pdf/Pu-RC0603_51_PbFree_L_2.pdf, CompType=Resistor, EIA_Code=E96, MountType=SMT, PackageReference=0603, PartNumber=RC0603FR-0730K1L, Res_ohm=30.1k, RoHS=Y, SizeArea_mm2=1.28, SizeAreaWB_mm2=4.68, SizeX_mm=1.6, SizeY_mm=0.8, SizeZ_mm=1, Supplier 1=Digi-Key, Supplier 2=Mouser, Supplier 3=Farnell, Supplier Part Number 2=603-RC0603FR-0730K1L, Supplier Part Number 3=1799339, Technology="Thick Film", Value1=1%, VDC_V=75V
R66: library part CMP-0022990-5, "RES, 2.49 k, 1%, 0.1 W, 0603", Manufacturer=Yageo, Power_W=100mW, Supplier Part Number 1=311-2.49KHRCT-ND, TempCo="100 ppm/C", Tolerance_%=1%, Value2=0.1W, Value_Code=2k49, ValueDisplayed=2.49k, AEC Category=Q200, AEC Grade=N/A, AEC Qualified=N, ComponentLink1Description="Datasheet link", ComponentLink1URL=http://www.yageo.com/pdf/Pu-RC0603_51_PbFree_L_2.pdf, CompType=Resistor, EIA_Code=E96, MountType=SMT, PackageReference=0603, PartNumber=RC0603FR-072K49L, Res_ohm=2.49k, RoHS=Y, SizeArea_mm2=1.28, SizeAreaWB_mm2=4.68, SizeX_mm=1.6, SizeY_mm=0.8, SizeZ_mm=1, Supplier 1=Digi-Key, Supplier 2=Mouser, Supplier 3=Farnell, Supplier Part Number 2=603-RC0603FR-072K49L, Supplier Part Number 3=1799330, Technology="Thick Film", Value1=1%, VDC_V=75V
R67: library part CMP-0082533-1, "RES, 4.99 k, 1%, 0.1 W, 0603", Manufacturer=Vishay-Dale, Power_W=100mW, Supplier Part Number 1=541-3985-1-ND, TempCo="100 ppm/C", Tolerance_%=1%, Value2=0.1W, Value_Code=4k99, ValueDisplayed=4.99k, AEC Category=Q200, AEC Grade=N/A, AEC Qualified=N, ComponentLink1Description="Datasheet link", ComponentLink1URL=http://www.vishay.com/docs/28773/crcwce3.pdf, CompType=Resistor, EIA_Code=E96, MountType=SMT, PackageReference=0603, PartNumber=CRCW06034K99FKEAC, Res_ohm=4.99k, RoHS=E, SizeArea_mm2=1.28, SizeAreaWB_mm2=4.68, SizeX_mm=1.6, SizeY_mm=0.8, SizeZ_mm=1, Supplier 1=Digi-Key, Supplier 2=Mouser, Supplier Part Number 2=71-CRCW06034K99FKEAC, Technology="Thick Film", Value1=1%, VDC_V=75V
R151 R152 R153 R154 R400 R401: library part CMP-0083440-1, "RES, 100 k, 5%, 0.5 W, 1210", Manufacturer=Yageo, Power_W=500mW, TempCo="100 ppm/C", Tolerance_%=5%, Value2=0.5W, Value_Code=100k, AEC Category=Q200, AEC Grade=N/A, AEC Qualified=N, ComponentLink1Description="Datasheet link", ComponentLink1URL=http://www.yageo.com/documents/recent/PYu-RC1210_51_RoHS_L_(4).pdf, CompType=Resistor, EIA_Code=E24, MountType=SMT, PackageReference=1210, PartNumber=RC1210JR-07100KL, Res_ohm=100k, RoHS=Y, SizeArea_mm2=8, SizeAreaWB_mm2=14.7, SizeX_mm=3.2, SizeY_mm=2.5, SizeZ_mm=1.35, Technology="Thick Film", Value1=5%, ValueDisplayed=100k, VDC_V=200V
R200 R201: library part CMP-0025898-5, "RES, 1.8 k, 5%, 0.1 W, 0603", Manufacturer=Yageo, Power_W=100mW, Supplier Part Number 1=311-1.8KGRCT-ND, TempCo="100 ppm/C", Tolerance_%=5%, Value2=0.1W, Value_Code=1k80, ValueDisplayed=1.8k, AEC Category=Q200, AEC Grade=N/A, AEC Qualified=N, ComponentLink1Description="Datasheet link", ComponentLink1URL=http://www.yageo.com/pdf/Pu-RC0603_51_PbFree_L_2.pdf, CompType=Resistor, EIA_Code=E24, MountType=SMT, PackageReference=0603, PartNumber=RC0603JR-071K8L, Res_ohm=1.8k, RoHS=Y, SizeArea_mm2=1.28, SizeAreaWB_mm2=4.68, SizeX_mm=1.6, SizeY_mm=0.8, SizeZ_mm=1, Supplier 1=Digi-Key, Supplier 2=Mouser, Supplier 3=Farnell, Supplier Part Number 2=603-RC0603JR-071K8L, Supplier Part Number 3=9233415, Technology="Thick Film", Value1=5%, VDC_V=75V
R300: library part CMP-0092857-1, "Thick Film Resistors - SMD 1/2watt 1.5ohms 1% High Power AEC-Q200", Manufacturer=Vishay, Operating Temperature Range="-55°C to +155°C", Power_W=500mW, TempCo=200ppm/°C, Tolerance_%=5%, AEC Grade="Grade 0", AEC Qualified=Yes, ComponentLink1Description=Datasheet, ComponentLink1URL=https://www.vishay.com/docs/20043/crcwhpe3.pdf, datasheet=https://www.vishay.com/docs/20043/crcwhpe3.pdf, Datasheet Path=datasheets/Res-CRCW080510R0JNEAHP.pdf, helpURL=https://upverter.com/upn/revision/5f84fa7f25e15205/, Lead Free=Yes, PackageReference=0805, Part Number=CRCW08051R50FKEAHP, PartNumber=CRCW08051R50FKEAHP, Res_ohm=1.5, RoHS=TRUE, Series="CRCW-HP e3", SizeZ_mm=0.6mm, Technology="Thick Film", VDC_V=150V
R1000 R1001 R1002 R1003 R1004 R1005: library part CMP-0096818-1, "0 Ohms Jumper 0.245W Chip Resistor 0805 (2012 Metric) - Metal Element", Digikey Part Number=JR0805X35ECT-ND, Manufacturer=Ohmite, Mouser Part Number=588-JR0805X35E, Operating Temperature Range="-55°C to +150°C", Power_W=245mW, AEC Qualified=No, ComponentLink1Description=Datasheet, ComponentLink1URL=https://www.ohmite.com/assets/docs/res_jr.pdf?r=false, datasheet=https://www.ohmite.com/assets/docs/res_jr.pdf?r=false, Datasheet Path=datasheets/Res-JR0805X35E.pdf, Digikey Description="0805 35 AMP JUMPER", helpURL=https://upverter.com/upn/revision/e75c93f7c2da56bf/, Lead Free=Yes, Mouser Description="0 Ohms Jumper 0.245W Chip Resistor 0805 (2012 Metric) - Metal Element", PackageReference=0805, Part Number=JR0805X35E, PartNumber=JR0805X35E, Res_ohm=0, RoHS=TRUE, Series=JR, SizeZ_mm=0.55mm, Supplier 1=Digikey, Supplier 2=Mouser, Supplier Part Number 1=JR0805X35ECT-ND, Supplier Part Number 2=588-JR0805X35E, Technology="Metal Element"
SH-JP1 SH-JP2 SH-JP3 SH-JP4 SH-JP5 SH-JP6 SH-JP7 SH-JP8 SH-JP9 SH-JP10 SH-JP11: library part CMP-0003623-3, "Shunt, 100mil, Gold plated, Black", Alternate Manufacturer=3M, Alternate PartNumber=969102-0000-DA, Manufacturer=Samtec, Supplier Part Number 1=SAM8858-ND, ClassName=Shunt, ComponentLink1Description="Datasheet Link", ComponentLink1URL=http://www.samtec.com/ftppub/pdf/SNT.PDF, CompType=Shunt, MountType=N/A, Note="You can \"mate\" this to a header by matching the designator.  i.e. use SH-J3 for header J3", PackageReference=Shunt, PartNumber=SNT-100-BK-G, RoHS=Y, Supplier 1=Digi-Key
TP1 TP2 TP3 TP4 TP5 TP6 TP7 TP8 TP9 TP10 TP11 TP12 TP13 TP14 TP15 TP16 TP17 TP18 TP19 TP20 TP21 TP22 TP23 TP24 TP25 TP26 TP27 TP28 TP29 TP30 TP31 TP32 TP33 TP34 TP41 TP42 TP43 TP44 TP45 TP46: library part CMP-0055139-1, "Test Point, Miniature, White, TH", Color=White, Manufacturer=Keystone, Supplier Part Number 1=36-5002-ND, CNHeader=FALSE, ComponentLink1Description="Datasheet URL", ComponentLink1URL=http://www.keyelco.com/userAssets/file/M60-2p60.pdf, CompType="Test Point", ContactFinish=Silver, CT=TRUE, Green_EU RoHS=Passed, Green_EU RoHS-2=Passed, Green_Lifecycle=Active, Green_REACh=Passed, LatestRevisionDate=26/05/2017, MountType=TH, PackageReference="White Miniature Testpoint", PartNumber=5002, Publisher="Texas Instruments", RoHS=Y, Supplier 1=Digi-Key, Supplier 2=Newark, Supplier 3=Mouser, Supplier Part Number 2=82H9632, Supplier Part Number 3=534-5002
TP35 TP36 TP37 TP38 TP39 TP40 TP47: library part CMP-0055153-1, "Test Point, Compact, SMT", Manufacturer=Keystone, Supplier Part Number 1=36-5016TR-ND, CNHeader=FALSE, ComponentLink1Description="Datasheet URL", ComponentLink1URL=http://www.keyelco.com/userAssets/store/files/5016.PDF, CompType="Test Point", CT=TRUE, Green_EU RoHS=Passed, Green_EU RoHS-2=Incomplete, Green_Lifecycle=Active, Green_REACh=Passed, LatestRevisionDate=26/05/2017, MountType=SMT, PackageReference=Testpoint_Keystone_Compact, PartNumber=5016, Publisher="Texas Instruments", RoHS=Y, Supplier 1=Digi-Key, Supplier 2=Mouser, Supplier Part Number 2=534-5016
U1: library part CMP-0091286-5, "Standalone/I2C Controlled, 70V, 20A Buck-Boost Multi-Chemistry Battery Charge Controller", Manufacturer="Texas Instruments", Max Supply Voltage=70V, Min Supply Voltage=4.2V, Operating Temperature Range="-40°C to +125°C", Output Voltage=0-60V, AEC Category=Q200, AEC Qualified=No, ComponentLink1Description="Datasheet Link", ComponentLink1URL=http://www.ti.com/lit/ds/symlink/GPN.pdf, ComponentLink2Description="Product Folder", ComponentLink2URL=http://www.ti.com/product/GPN, ComponentLink3Description="Online Datasheet", ComponentLink3URL=http://www.ti.com/product/GPN/datasheet, CompType=IC, Datasheet Path=datasheets/IC-BQ25750RRVT.pdf, helpURL=https://upverter.com/upn/revision/a545d73492f68e46/, Lead Free=Yes, Number Of Cells=16, Number Of Outputs=1, PackageReference=VQFN36, Part Number=BQ25750RRVT, PartNumber=BQ25750RRVT, RoHS=TRUE, SizeZ_mm=1mm, Standoff Height=0mm, TaMax_C=+105°C, TaMin_C=-40°C, Tjmax_C=+125°C
U2: library part CMP-0093068-2, "Linear Voltage Regulator IC Positive Adjustable 1 Output 50mA 8-MSOP-EP", Digikey Part Number=LT3010EMS8E#PBF-ND, Dropout Voltage=300mV, Manufacturer="Analog Devices", Max Supply Voltage=80V, Min Supply Voltage=3V, Mouser Part Number=584-LT3010EMS8E#PBF, Nominal Supply Current=30-1800uA, Operating Temperature Range="-40°C to +125°C", Output Voltage=1.275-60V, Part Number=LT3010EMS8E-PBF, AEC Grade="Grade 1", AEC Qualified=Yes, ComponentLink1Description=Datasheet, ComponentLink1URL=https://www.analog.com/media/en/technical-documentation/data-sheets/lt3010-3010-5.pdf, datasheet=https://www.analog.com/media/en/technical-documentation/data-sheets/lt3010-3010-5.pdf, Datasheet Path=datasheets/IC-LT3010EMS8E-PBF.pdf, Digikey Description="IC REG LINEAR POS ADJ 50MA 8MSOP", helpURL=https://upverter.com/upn/revision/e5aac9d40dbbb324/, Lead Free=Yes, Mouser Description="LDO Regulator Pos 1.275V to 60V 0.05A Automotive 8-Pin MSOP EP Tube", Number Of Outputs=1, Output Type=AdjustableProgrammable, PackageReference=MSOP8, PartNumber=LT3010EMS8E-PBF, RoHS=TRUE, SizeZ_mm=1.1mm, Standoff Height=0.0508mm, Supplier 1=Digikey, Supplier 2=Mouser, Supplier Part Number 1=LT3010EMS8E#PBF-ND, Supplier Part Number 2=584-LT3010EMS8E#PBF, Tjmax_C=+125°C
ZZ1: library part CMP-0077236-1, ClassName=AssemblyNote, CompType=AssemblyNote, Key=AssemblyNote, LatestRevisionDate=2017-08-10, Publisher="Texas Instruments"
ZZ2: library part CMP-0077237-1, ClassName=AssemblyNote, CompType=AssemblyNote, Key=AssemblyNote, LatestRevisionDate=2017-08-10, Publisher="Texas Instruments"
ZZ3: library part CMP-0077238-1, ClassName=AssemblyNote, CompType=AssemblyNote, Key=AssemblyNote, LatestRevisionDate=2017-08-10, Publisher="Texas Instruments"
ZZ4 ZZ5 ZZ6 ZZ7: library part CMP-0077238-1, "These assemblies must comply with workmanship standards IPC-A-610 Class 2, unless otherwise specified.", ClassName=AssemblyNote, CompType=AssemblyNote, Key=AssemblyNote, LatestRevisionDate=2017-08-10, Publisher="Texas Instruments"

## Free pads (board coordinates)
  round 200 hole 114.17 mask+1.97: Pad1(3275.32,463.57) Pad2(736,779)

## Via types
v1: diameter 24, hole 10, Top Layer to Bottom Layer, tented both sides, 653 vias
v2: diameter 24, hole 9.8, Top Layer to Bottom Layer, tented both sides, 132 vias
v3: diameter 24, hole 14, Top Layer to Bottom Layer, tented both sides, 105 vias
v4: diameter 40, hole 20, Top Layer to Bottom Layer, tented both sides, 21 vias
v5: diameter 19.68, hole 7.87, Top Layer to Bottom Layer, tented both sides, 16 vias

## Nets (pads, with @x,y where several pads share a name; then routed paths per layer and width w, separated by ;. In a path a pad name is that pad's centre, name@x,y a point inside that pad or via, vN(x,y) a via of type N, cw(c..) or ccw(c..) an arc to the next point about the centre after c; other vN are vias at no path point)
3V3_PULLUP: C48.1 C50.1 R48.2 R69.1 TP32.1 U2.1 | length 3756.5
  Layer 3 w20: 3591.45,42.45 3591.58,42.32 3713.47,42.32 3717.92,46.76 v3(3719,46.76)
  Layer 3 w24: TP32.1@576,89 622.55,42.45 3591.45,42.45
  Bottom Layer w14: U2.1@410.51,342.17 411.78,343.44 423.39,343.44 434.32,354.38 460.88,354.38 R48.2@501.51,354.38 ; C48.1@660.62,354.38 C48.1@665,350
  Bottom Layer w24: R48.2@501.51,354.38 C48.1@660.62,354.38 ; TP32.1@572,92 TP32.1@576,96 ; TP32.1@576,89 TP32.1@576,96 ; C48.1@665,350 665,252.47 576,163.47 TP32.1@576,96 ; v3(3719,46.76) 3741.71,46.76 3744.47,49.53 R69.1@3744.47,50.37
/CE: JP13.1 R56.1 TP21.1 U1.7 | length 2115.1
  Top Layer w9.84: U1.7@2179.55,1020.76 2179.55,980.95 2190.87,969.63 2190.87,948.55 v1(2193.58,945.84)
  Top Layer w10: JP13.1@3698,1223 3698,1130.78 3733,1095.78 TP21.1@3733,1088 3733,1081.52 3866.52,948 R56.1@3867.5,948
  Layer 3 w10: v1(2193.58,945.84) 2193.58,942.05 2216.3,919.33 2505.53,919.33 2585.32,839.53 3437.97,839.53 3683.86,1085.42 3730.42,1085.42 TP21.1@3733,1088
/INT: J8.5 JP14.2 TP30.1 U1.3 | length 3044.9
  Top Layer w9.84: v1(2083.46,899.33) 2083.46,923.64 2100.81,940.99 U1.3@2100.81,1020.76
  Top Layer w10: TP30.1@3678.5,135.5 TP30.1@3675,132 3763,132 3774,121 JP14.2@3860,121 ; JP14.2@3854.5,135.5 JP14.2@3858,139
  Layer 3 w10: v1(2083.46,899.33) 2083.46,989.34 2062.85,1009.95 2040.61,1009.95 1939.97,909.3 1939.97,351.18 2129.15,162 3332.47,162 ; J8.5@3333,113 3332.47,113.53 3332.47,162 ; TP30.1@3675,132 3667.16,139.84 3599.12,139.84 3576.96,162 3332.47,162
/PG: D6.1 J8.8 TP9.1 U1.6 | length 2902.7
  Top Layer w9.84: U1.6@2159.86,1020.76 2159.86,956.71 2164.79,951.79 2164.79,932.59 2183.56,913.82 v1(2183.56,913.52)
  Top Layer w10: TP9.1@3699.5,948 3793,854.5 D6.1@3828,854.5
  Layer 3 w10: v1(2183.56,913.52) 2186.23,913.52 2200.26,899.49 2433.21,899.49 2596.81,735.89 3487.39,735.89 TP9.1@3699.5,948
  Layer 4 w10: J8.8@3433,213 3485.64,213 3545.95,273.3 3545.95,905.13 3588.81,948 TP9.1@3699.5,948
AC_OUT: C7.2 C44.2 C500.2 C501.2 C508.2 C509.2 C510.2 C512.2 Q6.5-6-7-8 R2.1 R5.2 R1000.2 R1001.2 TP45.1 | length 1492.9
  Top Layer w10: R2.1@506.69,1640.5 509,1642.82 v1(582.78,1642.82) ; v1(1666.85,1192.79) 1691.61,1192.79 1706,1178.4 1767.44,1178.4 R5.2@1769.58,1176.27
  Layer 3 w10: v1(582.78,1642.82) 603.16,1622.44 603.16,1561.28 964.65,1199.79 1656.07,1199.79 1663.06,1192.79 v1(1666.85,1192.79)
  other v1: 533.1,1521 349.32,1549.77 398.57,1549.77 349.32,1589.77 398.57,1589.77 349.32,1629.77 398.57,1629.77 349.32,1669.77 398.57,1669.77 349.32,1709.77 398.57,1709.77 349.32,1749.77 398.57,1749.77 526.36,1759.99 204,1852.53 204,1893 348.82,1909.01 379.24,1909.01 104,1917.3 204,1933 348.82,1949.01 379.24,1949.01 104,1957.3 204,1973 348.82,1989.01 379.24,1989.01 104,1997.3 348.82,2029.01 379.24,2029.01 104,2037.3 316.07,2037.3 348.82,2069.01 379.24,2069.01 104,2077.3 348.82,2109.01 379.24,2109.01 104,2117.3 316.07,2132 104,2164.4 104,2204.4 204,2364 387.86,2368.86 89.43,2370 119,2370 354,2370 204,2404 387.86,2408.86 89.43,2410 119,2410 354,2410 204,2444 387.86,2448.86 89.43,2450 119,2450 354,2450 387.86,2488.86 89.43,2490 119,2490 354,2490 387.86,2528.86 89.43,2530 119,2530 354,2530 387.86,2568.86 89.43,2570 119,2570 354,2570 129.32,2861.41
  other v2: 268.82,2884.5 308.82,2884.5 348.82,2884.5 388.82,2884.5 268.82,2924.5 308.82,2924.5 348.82,2924.5 388.82,2924.5 268.82,2964.5 308.82,2964.5 348.82,2964.5 388.82,2964.5 268.82,3004.5 308.82,3004.5 348.82,3004.5 388.82,3004.5
ACDRV: R12.1 TP4.1 U1.31 | length 2755.5
  Top Layer w9.84: v3(1949.19,1144.53) 1949.43,1144.77 U1.31@2035.85,1144.77
  Layer 3 w10: v4(597.22,2795.71) 598.26,2794.67 716.01,2794.67 TP4.1@717.06,2793.63
  Layer 3 w80: 1630.07,1597.65 1885.32,1342.4 1885.32,1208.41 v3(1949.19,1144.53)
  Layer 3 w120: v4(597.22,2795.71) 597.22,2213.78 1101.23,1709.77 1499.06,1709.77 1611.18,1597.65 1630.07,1597.65
  Bottom Layer w40: v4(597.22,2795.71) R12.1@597.22,2888.47
ACN: C11.1 C34.2 R6.1 TP11.1 U1.29 | length 640.8
  Top Layer w9.84: 1984.07,1184.14 U1.29@2035.85,1184.14
  Top Layer w10: TP11.1@1617.5,1387.5 1636.44,1387.5 1658.94,1365 1892.46,1365 1898.32,1359.14 1898.32,1323.86 C11.1@1896.45,1321.99 C34.2@1896.45,1244.91 ; R6.1@1828.64,1247 1894.35,1247 C34.2@1896.45,1244.91 ; 1984.07,1184.22 1983.89,1184.22 1928.49,1239.62 1901.74,1239.62 C34.2@1898.32,1243.04 C34.2@1896.45,1244.91
ACOV: C32.1 R27.1 R30.2 TP14.1 U1.35 | length 939.9
  Top Layer w9.84: 1990.89,1053.19 2003.73,1066.03 U1.35@2035.85,1066.03
  Top Layer w10: R27.1@1482.45,781.19 R27.1@1488.95,781.19 ; R27.1@1487.48,761.19 1496.13,769.84 R30.2@1579.96,769.84 ; v1(1579.96,846.62) R30.2@1579.96,790.63 R30.2@1579.96,769.84 ; TP14.1@1596.8,645.13 1596.8,690 1581.63,705.17 1579.96,705.17 R30.2@1579.96,769.84 ; C32.1@1983.89,981.03 v1(1983.89,1027.5) 1983.89,1046.2 1990.89,1053.19
  Layer 3 w10: v1(1579.96,846.62) 1833.95,846.62 1877.84,890.52 1877.84,930.96 1970.05,1023.16 1971.71,1024.82 1981.21,1024.82 v1(1983.89,1027.5)
ACP: C10.1 C34.1 R5.1 TP10.1 U1.30 | length 953.8
  Top Layer w9.84: 1975.91,1164.46 U1.30@2035.85,1164.46
  Top Layer w10: TP10.1@1279.4,1296.53 1292.79,1283.13 1292.79,1242.05 1350.71,1184.14 1596.8,1184.14 1622.38,1158.56 1728.14,1158.56 1744.96,1141.74 1799.03,1141.74 1828.64,1171.35 R5.1@1828.64,1176.27 1894.54,1176.27 C34.1@1896.45,1178.18 ; TP10.1@1294.4,1303.39 TP10.1@1307.79,1289.99 ; C10.1@1896.45,1113.97 C34.1@1896.45,1178.18 ; 1975.91,1164.53 1975.52,1164.53 1958.93,1181.12 1899.39,1181.12 C34.1@1896.45,1178.18
ACUV: C20.1 R21.1 R27.2 TP13.1 U1.34 | length 1083.6
  Top Layer w9.84: C20.1@1915.76,981.03 1925.84,991.11 1925.84,1015.48 1944.04,1033.68 v1(1944.04,1035.12) ; v1@1944.04,1039.58 1948.5,1039.58 1968.79,1059.87 1968.79,1069.88 1984.63,1085.72 U1.34@2035.85,1085.72
  Top Layer w10: TP13.1@1428.34,635.59 1428.34,688.82 1422.5,694.66 1422.5,835.35 1428.34,841.19 R27.2@1487.48,841.19 1482.45,846.23 1482.45,887.05 1507.47,912.07 R21.1@1579.96,912.07 1563.1,928.94 v1(1563.1,965.65)
  Layer 3 w10: v1(1563.1,965.65) 1566.89,965.65 1573.31,959.22 1868.14,959.22 v1(1944.04,1035.12)
BAT: C24.1 C31.1 C38.2 C39.2 C78.1 C506.2 C507.2 C516.2 C517.2 C518.2 C519.2 D9.2 J3.1 J7.1 R24.1 R25.1 R28.2 R59.2 R400.2 R401.2 TP3.1 | length 9144
  Top Layer w10: R25.1@2550.21,1069.88 2582.97,1069.88 2599.97,1086.88 v1(2603.76,1086.88) ; R28.2@2707.04,1138.12 v1(2707.04,1293.06) 2772.65,1293.06 R59.2@2780.2,1300.61 ; v1(3586.31,1594.14) 3624.9,1594.14 3639.59,1579.45 R24.1@3639.59,1577.28
  Top Layer w40: J7.1@2359.13,3220.53 2359.13,3204.78 2362.76,3201.16 2406.97,3201.16 2413.51,3194.62 2551.46,3194.62 2613.84,3257 3079.27,3257
  Layer 3 w10: v1(2603.76,1086.88) 2607.54,1086.88 2613.27,1092.61 3340.69,1092.61 3558.39,1310.31 3558.39,1566.22 v1(3586.31,1594.14) ; v1(2707.04,1293.06) 2707.04,1317.71 2727.06,1337.73 2727.18,1337.73 3129.33,1739.88 3129.33,2917.15 J3.1@3076.42,2970.06
  Bottom Layer w24: 628.5,517.5 983.44,517.5 1007.07,493.87 1007.07,66.06 1021.13,52 3505,52 3586.31,133.31 3586.31,1361.61
  Bottom Layer w40: D9.2@483.44,517.5 628.5,517.5
  other v1: 3740.36,1363.83 3789.62,1363.83 3740.36,1443.83 3789.62,1443.83 3740.36,1523.83 3789.62,1523.83 3739.82,1595.78 3789.08,1595.78 3739.82,1675.78 3789.08,1675.78 3739.82,1755.78 3789.08,1755.78 4028.57,1903 4182.02,1905 4224.93,1906.69 4028.57,1943 4182.02,1945 4224.93,1946.69 4028.57,1983 4182.02,1985 4224.93,1986.69 4028.57,2023 4182.02,2025 4224.93,2026.69 4028.57,2063 4182.02,2065 4224.93,2066.69 4028.57,2103 4182.02,2105 4224.93,2106.69 4041.57,2192.16 4314.57,2206 4355,2206 4076.57,2210.65 4041.57,2232.16 4314.57,2246 4355,2246 4076.57,2248 4041.57,2272.16 4314.57,2286 4355,2286 4076.57,2288 4041.57,2312.16 4314.57,2326 4355,2326 4076.57,2328 4041.57,2352.16 4314.57,2366 4355,2366 4076.57,2368 4041.57,2392.16 4314.57,2406 4355,2406 4076.57,2408 3708,2800 3524.03,2802 3749.5,2802 3789.5,2802 3027,2809.31 3229.08,2809.31 3333.29,2809.31 3594.69,2809.31 3634.69,2809.31 3708,2840 3524.03,2842 3708,2880 3524.03,2882 3432,2908 3481.96,2908 3708,2920 3524.03,2922 3558.51,3033.05 3594.69,3033.18 3634.69,3033.05 3678,3033.05 3594,3072 3634.69,3072 3052.82,3079.91 3092.82,3079.91 3132.82,3079.91 3172.82,3079.91 3594,3107 3634.69,3107 3052.82,3119.91 3092.82,3119.91 3132.82,3119.91 3172.82,3119.91 3053.82,3161.91 3093.82,3161.91 3133.82,3161.91 3173.82,3161.91 3053.82,3201.91 3093.82,3201.91 3133.82,3201.91 3173.82,3201.91
BAT_DRV: R9.2 TP5.1 U1.15 | length 824.8
  Top Layer w9.84: U1.15@2264.2,1125.09 2327.66,1125.09
  Top Layer w10: 2327.66,1125.09 2331.76,1120.99 2349.69,1120.99 2376.54,1147.83 ; v4@2859.48,1165.83 2859.48,1200.18 TP5.1@2945.3,1285.99
  Top Layer w20: 2376.54,1147.83 v3@2391.96,1147.83
  Layer 3 w40: v3(2392.07,1147.83) 2406.8,1162.55 2849.22,1162.55 v4(2859.75,1152.03)
  Bottom Layer w40: R9.2@2856.73,1201.2 2856.73,1155.04 v4(2859.75,1152.03)
BAT_SRC: C36.2 Q7.1 Q7.2 Q7.3 Q8.1 Q8.2 Q8.3 R1004.2 R1005.2 TP6.1 U1.16 | length 2151
  Top Layer w9.84: U1.16@2264.2,1144.77 2277.61,1144.77 2311.27,1144.77 2311.62,1145.12
  Top Layer w10: 2311.27,1144.85 2312.08,1144.85 2314.8,1147.57 2336.92,1147.57 v3(2339.6,1150.25)
  Layer 3 w10: v3(2339.6,1150.25) 2415.13,1074.72 2517.26,1074.72 2540.8,1051.18 2963.38,1051.18 2991.64,1022.92 3021.02,1022.92 3053.41,1055.31 3396.9,1055.31 3397,1055.21 3412.2,1055.21 3478.82,988.58 TP6.1@3478.82,980.4
  Layer 3 w40: v3(2339.6,1150.25) 2339.6,1173.5 2378.49,1212.39 2869.87,1212.39 2873.34,1208.92 v4(3130.46,1208.92)
  other v1: 3496.99,1101.11 3496.99,1141.11 3011.93,1165.83 3496.99,1181.11 3242.88,1217.02 3282.88,1217.02 3322.88,1217.02 3522.65,1231.61
BTST1: R13.1 TP26.1 U1.26 | length 990.2
  Top Layer w9.84: 2069,1270.15 2073.95,1270.15 2082.72,1261.38 2088.5,1261.38 2100.81,1249.07 U1.26@2100.81,1209.73
  Top Layer w10: v3(2051.97,1298.12) 2054.64,1295.44 2054.64,1284.5 2069,1270.15
  Top Layer w24: R13.1@2028.2,1326.16 R13.1@2030.92,1323.44 ; 2030.92,1298.12 v3(2051.97,1298.12)
  Top Layer w30: 2030.92,1298.12 R13.1@2030.92,1323.44
  Bottom Layer w10: TP26.1@1333.1,1054.17 TP26.1@1341.09,1054.17 ; TP26.1@1349.61,1064.95 1625.61,1064.95 1858.79,1298.12 v3(2051.97,1298.12) ; TP26.1@1352.63,1099.85 TP26.1@1365.48,1087
BTST2: R23.1 TP28.1 U1.20 | length 596.5
  Top Layer w9.84: U1.20@2218.92,1209.73 2218.92,1226.5 2228.72,1236.31 2234.9,1236.31 2245.02,1246.42 v3(2248.85,1246.42) ; v3@2246.28,1248.99 v3@2251.42,1248.99
  Top Layer w10: v3(2248.85,1246.42) v3@2251.42,1248.99
  Top Layer w20: v3@2251.42,1248.99 2307.09,1304.66
  Top Layer w24: R23.1@2339.6,1304.66 2340.56,1305.62 R23.1@2342.36,1305.62
  Top Layer w40: 2307.09,1304.66 R23.1@2339.6,1304.66